# Altium PCB MiniPC.PcbDoc (part 17 of 24)
Units mm, origin at the board's own origin, x right, y up, seen from the top; angles counter-clockwise.
Board outline 175 x 155 mm, 16 copper layers (1_Top, 2_int1_(gnd), 3_int2_(power), 4_int3_(gnd), 5_int4_(sign), 6_int5_(power), 7_int6_(sign), 8_int7_(power), 9_int8_(gnd), 10_int9_(sign), 11_int10_(gnd), 12_int11_(sign), 13_int12_(gnd), 14_int13_(power), 15_int14_(gnd), 16_Bottom), stack 2.008 mm thick; 1046 components, 837 nets, 6010 pads, 4009 vias.
Unrouted connection lines stored in the file: 564.
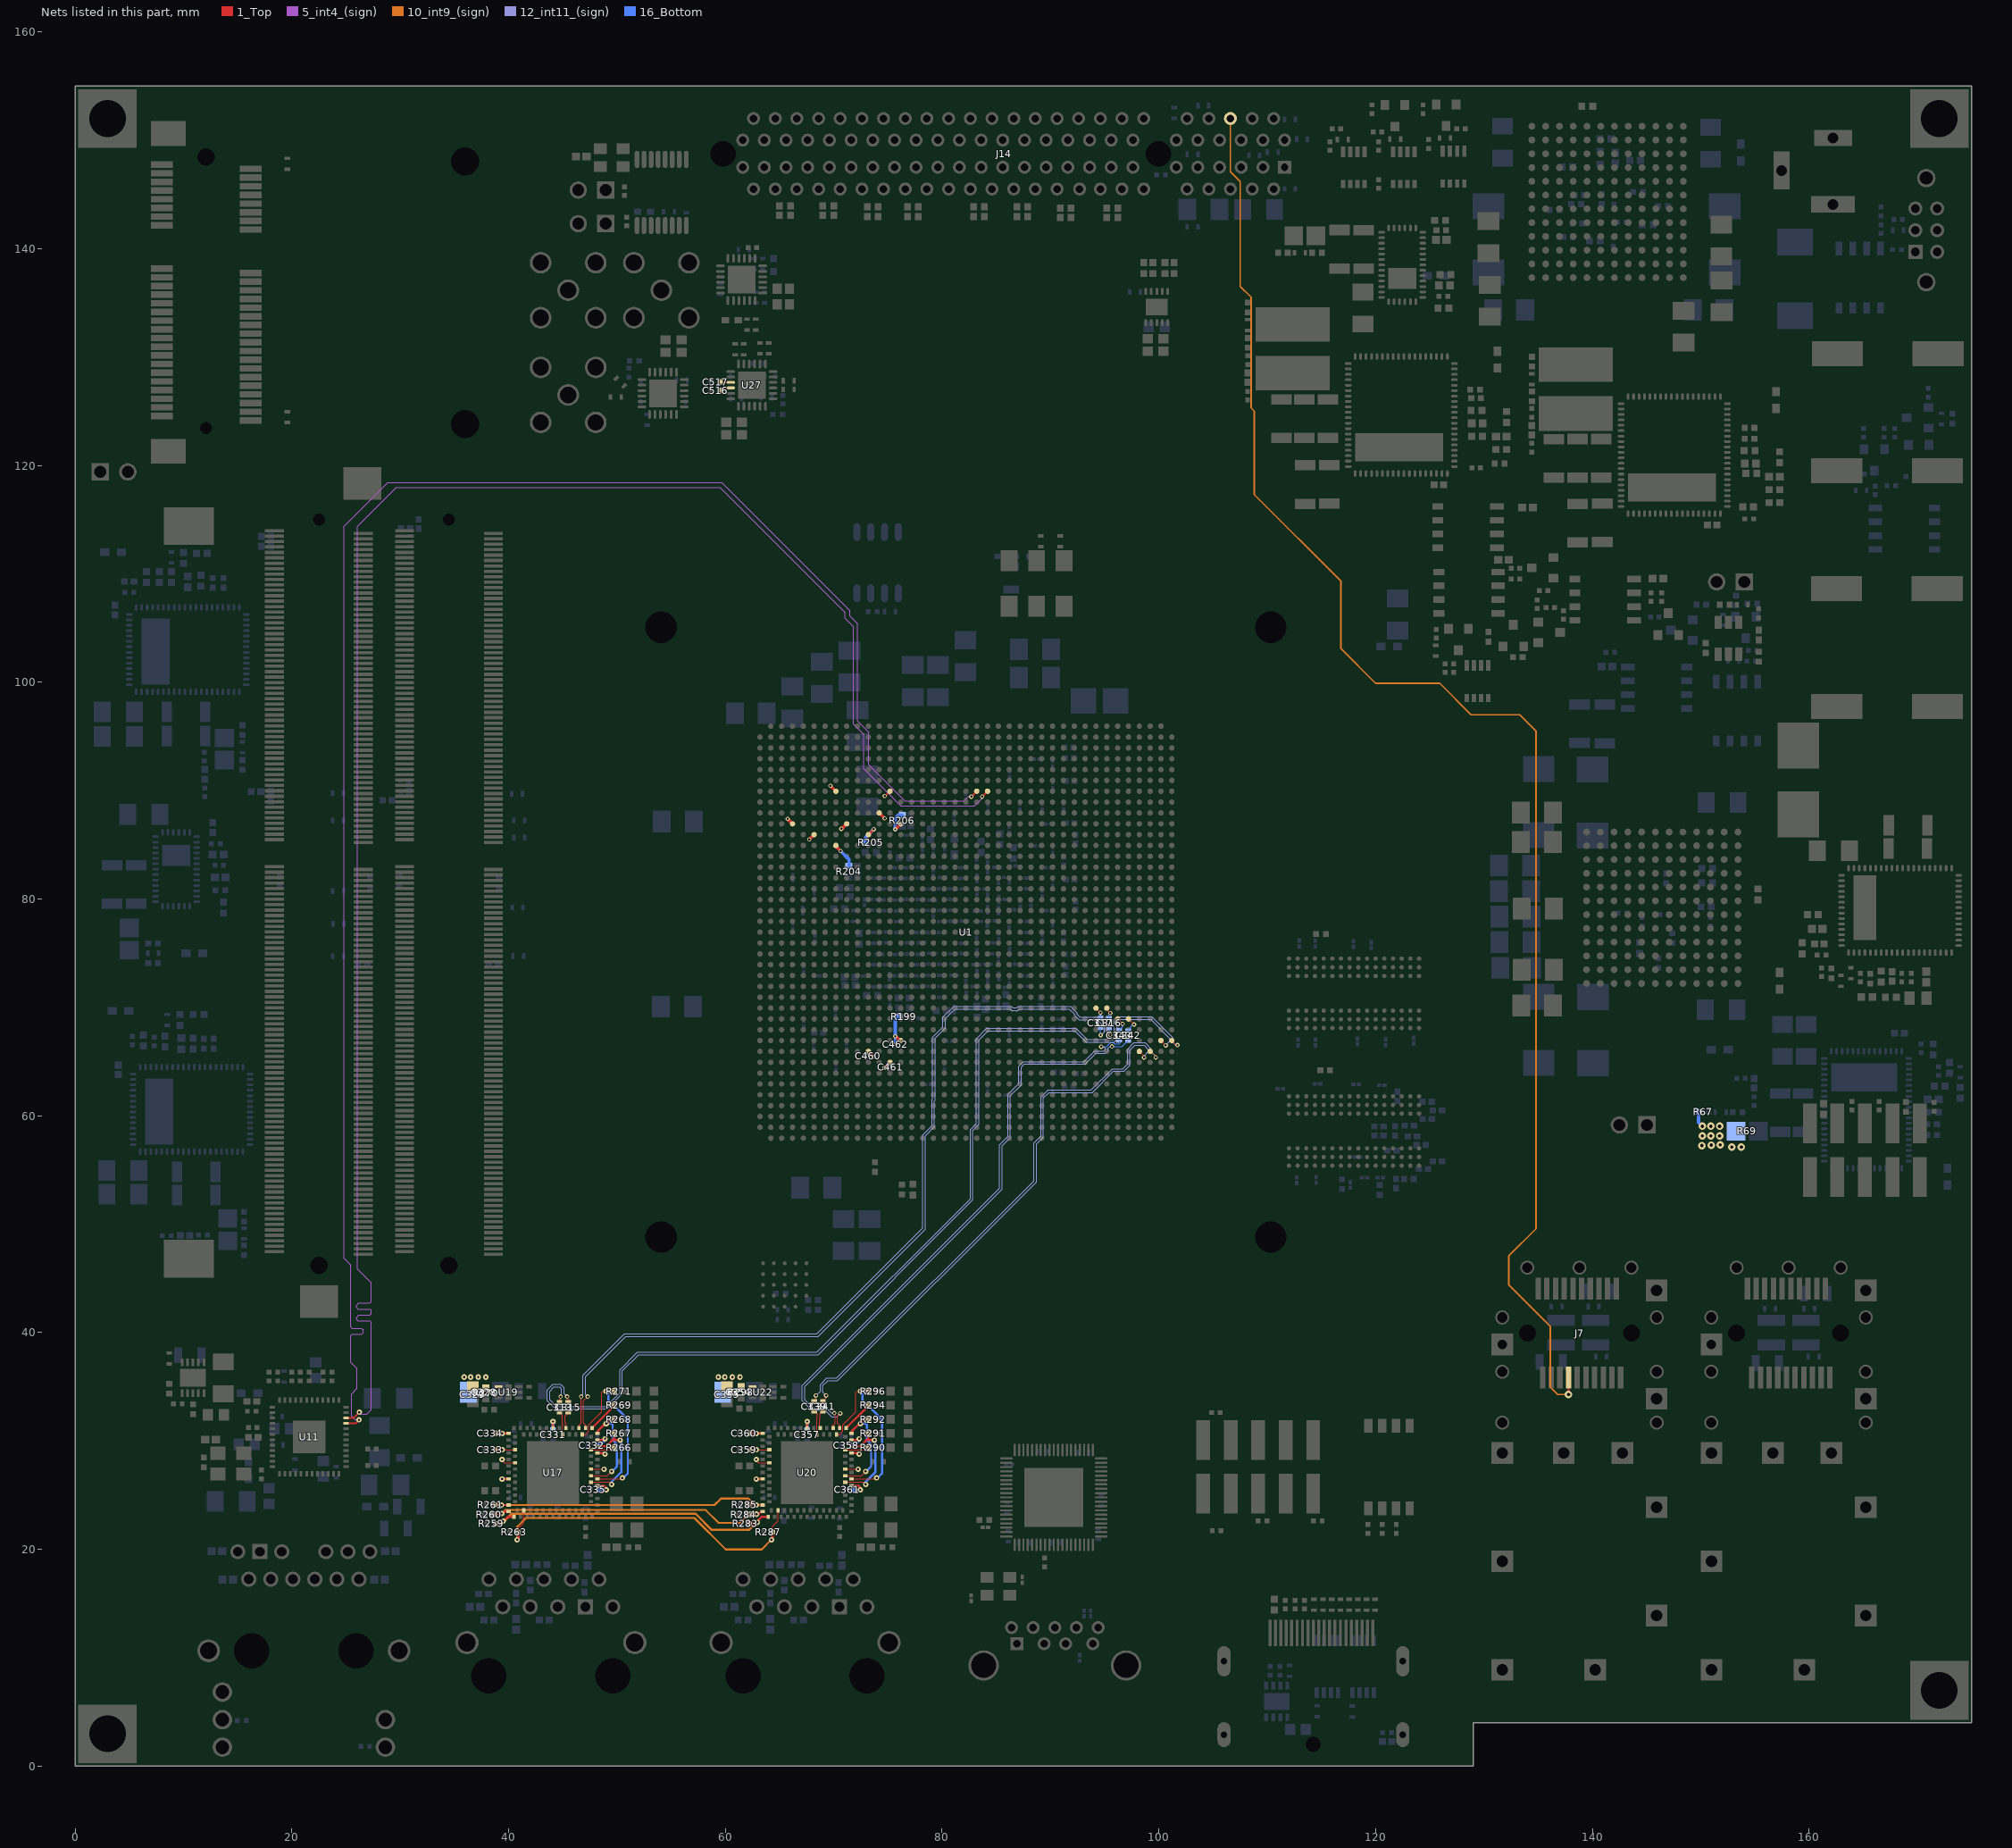
[diagram p29: the nets of this part, all layers, seen from the top]

## Via types
v1: diameter 0.4, hole 0.2, 1_Top to 16_Bottom, tented both sides, 1658 vias
v2: diameter 0.5, hole 0.2, 1_Top to 16_Bottom, tented both sides, 1014 vias
v3: diameter 0.7, hole 0.3, 1_Top to 16_Bottom, tented both sides, 915 vias
v4: diameter 0.6, hole 0.2, 1_Top to 16_Bottom, tented both sides, 278 vias
v5: diameter 0.4, hole 0.2, 1_Top to 16_Bottom, 93 vias
v6: diameter 0.4/0/0/0/0/0/0/0/0/0/0/0/0/0/0/0.4 (per signal layer), hole 0.2, 1_Top to 16_Bottom, tented both sides, 18 vias
v7: diameter 0.4/0/0/0/0/0/0/0/0/0/0/0.4/0.4/0.4/0.4/0.4 (per signal layer), hole 0.2, 1_Top to 16_Bottom, tented both sides, 16 vias
v8: diameter 0.5, hole 0.254, 1_Top to 16_Bottom, tented both sides, 15 vias
v9: diameter 0.5, hole 0.2, 1_Top to 16_Bottom, 2 vias

## Nets (pads, with @x,y where several pads share a name; then routed paths per layer and width w, separated by ;. In a path a pad name is that pad's centre, name@x,y a point inside that pad or via, vN(x,y) a via of type N, cw(c..) or ccw(c..) an arc to the next point about the centre after c; other vN are vias at no path point) (continued)
ENET_HPS_TXD2: U1.G21 U11.21 | length 166.9
  1_Top w0.17: U11.21@25.012,31.625 25.876,31.625 v2(26.2,31.95) ; v1(82.694,89.439) U1.G21@83.194,89.939
  5_int4_(sign) w0.1: v2(26.2,31.95) 25.85,31.95 25.5,32.3 25.5,34.35 26.025,34.875 26.025,36.675 25.425,37.275 25.425,39.713 25.563,39.85 26.441,39.85 26.578,39.988 26.578,40.263 26.441,40.4 25.563,40.4 25.425,40.538 25.425,46.225 24.8,46.85 24.8,48.475 24.825,48.5 24.825,114.4 28.85,118.425 59.676,118.425 71.49,106.611 71.49,106.082 72.179,105.393 72.179,96.423 73.22,95.381 73.22,92.396 76.576,89.039 82.014,89.039 82.414,89.439 v1(82.694,89.439) ; v1@82.694,89.4 v1@82.7,89.4
ENET_HPS_TXD3: U1.G22 U11.22 | length 169.4
  1_Top w0.17: U11.22@25.012,32.125 25.69,32.125 26.214,32.65 v2(26.225,32.65) ; v1(83.694,89.439) U1.G22@84.194,89.939
  5_int4_(sign) w0.1: v2(26.225,32.65) 26.4,32.475 26.925,32.475 27.34,32.89 27.34,40.938 27.203,41.075 26.093,41.075 25.955,41.213 25.955,41.388 26.192,41.625 27.203,41.625 27.34,41.763 27.34,42.038 27.203,42.175 26.093,42.175 25.955,42.313 25.955,42.488 26.192,42.725 27.203,42.725 27.34,42.863 27.34,44.584 26.065,45.859 26.065,114.391 29.634,117.96 59.491,117.96 71.03,106.421 71.03,105.891 71.825,105.096 71.825,96.126 72.76,95.191 72.76,92.015 76.196,88.579 82.979,88.579 83.694,89.294 v1(83.694,89.439)
ENET_REFCLK_C_N: C516.1 U27.22 | length 1
  1_Top w0.1: C516.1@59.6,127 59.75,127.15 U27.22@60.5,127.15
ENET_REFCLK_C_P: C517.1 U27.21 | length 0.9
  1_Top w0.1: C517.1@59.6,127.7 59.65,127.65 U27.21@60.5,127.65
ENETA_DVDD: C328.2 C329.2 C331.2 C332.2 C333.2 C334.2 C335.2 R270.2 U17.A1 U17.A8 U17.A31 U17.A36 U17.A38 U17.A46 U17.B3 U17.B5 U17.B29 U19.4 | length 12.1
  1_Top w0.1: v2(39.4,28.3) 39.3,28.3 39.6,28 U17.B5@40.6,28 ; v2(39.4,29.2) U17.B3@40.6,29.2 ; U17.B29@47.6,27.4 v2(48.8,27.4)
  1_Top w0.2: C333.2@38.8,29.2 v2(39.4,29.2) ; v2(39.4,26.5) 39.3,26.5 U17.A8@40,26.5 ; v2(39.4,30.7) 39.3,30.7 U17.A1@40,30.7 ; U17.A46@44.1,31.2 v2(44.1,31.8) ; U17.A31@48.2,25.9 48.8,25.9 49,25.7 v2(49,25.5) ; U17.A36@48.2,28.9 48.7,28.9 48.8,28.8 v2(48.9,28.8) ; U17.A38@48.2,30.1 48.8,30.1 v2(48.9,30.2)
  1_Top w0.25: C334.2@38.8,30.7 v2@39.3,30.7
  16_Bottom w0.25: C331.2@44.1,31.1 v2(44.1,31.8) ; C332.2@48.2,29.6 48.4,29.6 v2@48.9,30.1 ; C335.2@48.3,25.5 v2(49,25.5)
  other v2: 35.9,35.9 36.5,35.9 37.2,35.9 37.9,35.9
ENETA_INTN: R261.1 R285.1 U17.A12 U20.A12 | length 26.7
  1_Top w0.2: R261.1@38.725,24.1 v2(39.35,24.1) U17.A12@40,24.1 ; R285.1@62.175,24.1 v2(62.85,24.1) U20.A12@63.45,24.1
  10_int9_(sign) w0.2: v2(39.35,24.1) 59,24.1 59.6,24.7 62.125,24.7 62.85,23.975 v2(62.85,24.1)
ENETA_LED_LINK10: R271.2 U17.A32 U17.B35 | length 17.4
  1_Top w0.1: U17.B35@46.8,30.6 47.1,30.6 47.4,30.9 47.4,31.5 48.6,32.7 48.6,34.5 48.7,34.6 v2(49,34.6) R271.2@49.7,34.6 ; U17.A32@48.2,26.5 50.5,26.5 v2(50.5,26.6)
  16_Bottom w0.2: v2@49.2,34.6 49.2,33.8 50.5,32.5 51,32 51,27 50.6,26.6 v2(50.5,26.6)
ENETA_LED_LINK100: R269.2 U17.A40 | length 2.9
  1_Top w0.2: U17.A40@47.7,31.2 49.7,33.2 R269.2@49.7,33.3
ENETA_LED_LINK1000: R268.2 U17.A39 U17.B28 | length 9.9
  1_Top w0.1: U17.B28@47.6,26.8 49.1,26.8 49.4,27.1 49.5,27.1 49.4,27.2 v2(49.5,27.2)
  1_Top w0.2: U17.A39@48.2,30.7 48.3,30.7 48.2,30.8 48.2,30.9 v2@48.95,31.65 ; v2(49,31.6) 49,31.8 49.6,31.8 R268.2@49.7,31.9
  16_Bottom w0.2: v2(49,31.6) 49.5,31.6 49.6,31.5 49.6,30.1 50,29.7 50,27.664 49.536,27.2 v2(49.5,27.2)
ENETA_LED_RX: R267.2 U17.A37 U17.B27 | length 9.7
  1_Top w0.1: U17.B27@47.6,26.2 49.3,26.2 v2(49.5,26)
  1_Top w0.2: U17.A37@48.2,29.5 49,29.5 49.258,29.758 49.6,30.1 ; R267.2@49.75,30.7 49.75,30.15 49.8,30.1 ; v2(50.3,30.075) 50.225,30 50.2,30 50.1,30.1 49.8,30.1 ; 49.6,30.1 49.8,30.1 ; 49.6,30.1 49.8,30.1
  16_Bottom w0.2: v2(49.5,26) 49.5,26.236 50.4,27.136 50.4,29.8 50.3,29.9 v2(50.3,30.075)
ENETA_LED_TX: R266.2 U17.B32 | length 1.9
  1_Top w0.1: U17.B32@47.6,29.2 49.4,29.2 R266.2@49.5,29.3
ENETA_MDC: R259.1 R283.1 U17.A14 U20.A14 | length 28.6
  1_Top w0.2: R259.1@38.8,22.4 39.3,22.4 v2(39.5,22.6) 39.9,23 U17.A14@40.5,23 ; R283.1@62.25,22.4 62.85,22.4 v2(62.95,22.5) 62.95,22.6 63.35,23 U20.A14@63.95,23
  10_int9_(sign) w0.2: v2(39.5,22.6) 39.6,22.6 40.3,23.3 57.241,23.3 58.741,21.8 62.15,21.8 62.85,22.5 v2(62.95,22.5)
ENETA_MDIO: R260.1 R284.1 U17.A13 U20.A13 | length 26.9
  1_Top w0.17: R260.1@38.9,23.225 39.275,23.225 v9(39.362,23.312) 39.55,23.5 U17.A13@40,23.5 ; R284.1@62.375,23.225 62.85,23.225 v9(62.875,23.25) ; v9@62.875,23.225 63.025,23.225 63.3,23.5 U20.A13@63.45,23.5
  10_int9_(sign) w0.17: v9(39.362,23.312) 39.685,23.635 58.19,23.635 59.375,22.45 61.35,22.45 62.15,23.25 v9(62.875,23.25)
ENETA_RESETN: R263.1 R287.1 U17.B13 U20.B13 | length 32.5
  1_Top w0.1: R263.1@40.9,21.6 40.9,21.948 41.4,22.448 U17.B13@41.4,23.6 ; R287.1@64.35,21.6 64.35,22.15 64.85,22.65 U20.B13@64.85,23.6
  1_Top w0.25: v2(40.8,20.9) 40.9,21 R263.1@40.9,21.6 ; v2(64.25,20.9) 64.35,21 R287.1@64.35,21.6
  10_int9_(sign) w0.2: v2(40.8,20.9) 40.8,22.1 41.6,22.9 57.146,22.9 60.046,20 63.35,20 v2(64.25,20.9)
ENETA_RX_N: C317.1 U1.AG32 | length 1
  1_Top w0.1: U1.AG32@94.194,69.939 94.605,69.529 v5(94.605,69.503)
  16_Bottom w0.1: v5(94.605,69.503) 94.605,69.322 94.633,69.293 94.625,69.285 C317.1@94.625,69.075
ENETA_RX_P: C316.1 U1.AG33 | length 1.1
  1_Top w0.1: U1.AG33@95.194,69.939 95.194,69.806 v5(95.525,69.475)
  16_Bottom w0.1: C316.1@95.4,69.05 95.4,69.35 v5(95.525,69.475)
ENETA_RXC_N: C317.2 U17.A41 | length 79.8
  1_Top w0.1: U17.A41@47.1,31.2 47.1,31.45 46.91,31.64 46.91,33.71 v1(47.3,34.1)
  12_int11_(sign) w0.09: v1(47.3,34.1) 47.1,34.3 47.1,35.961 50.799,39.66 68.56,39.66 78.44,49.54 78.44,58.141 79.3,59.001 79.3,61.4 79.355,61.455 79.355,67.155 80.312,68.112 80.312,68.988 81.185,69.86 86.283,69.86 86.458,69.685 86.497,69.685 86.527,69.715 86.813,69.715 86.843,69.685 86.942,69.685 87.117,69.86 91.74,69.86 92.215,69.385 92.215,69.258 92.613,68.86 94.315,68.86 94.975,68.2 94.975,67.75 94.675,67.45 v5(94.625,67.45)
  16_Bottom w0.1: v5(94.625,67.45) C317.2@94.625,68.075
ENETA_RXC_P: C316.2 U17.A42 | length 80.3
  1_Top w0.1: U17.A42@46.5,31.2 46.5,31.45 46.69,31.64 46.69,33.801 46.7,33.811 v1(46.7,34.1)
  12_int11_(sign) w0.09: v1(46.7,34.1) 46.86,34.26 46.86,36.06 50.7,39.9 68.461,39.9 78.2,49.639 78.2,58.24 79.06,59.1 79.06,61.53 79.115,61.585 79.115,67.254 80.072,68.212 80.072,69.087 81.086,70.1 86.382,70.1 86.527,69.955 86.873,69.955 87.018,70.1 91.839,70.1 91.864,70.076 92.455,69.484 92.455,69.357 92.712,69.1 94.414,69.1 95.215,68.299 95.215,67.743 v5(95.505,67.453)
  16_Bottom w0.1: C316.2@95.4,68.05 95.505,67.945 v5(95.505,67.453) v5@95.505,67.445
ENETA_TX_N: C315.1 U1.AK38 | length 90.6
  1_Top w0.1: v1(45.4,34.1) 45.4,33.91 45.5,33.81 C315.1@45.5,33.6 ; U1.AK38@100.194,66.939 v1(100.633,66.5)
  12_int11_(sign) w0.09: v1(45.4,34.1) 45.14,34.36 45.14,34.899 44.799,35.24 44.101,35.24 43.56,34.699 43.56,33.701 44.301,32.96 49.099,32.96 50.5,34.361 50.5,36.46 52,37.96 68.56,37.96 82.84,52.24 82.84,58.641 83.4,59.201 83.4,67 84.215,67.815 85.457,67.815 85.942,67.815 92.26,67.815 93.29,66.785 95.899,66.785 96.14,67.026 96.14,68.74 96.3,68.9 99.247,68.9 101.047,67.1 101.047,66.913 v1(100.633,66.5)
ENETA_TX_P: C313.1 U1.AK39 | length 90
  1_Top w0.1: C313.1@44.7,33.6 44.7,33.81 44.8,33.91 v1(44.8,34.1) ; U1.AK39@101.194,66.939 101.7,66.433 101.71,66.443 v1(101.71,66.52)
  12_int11_(sign) w0.09: v1(44.8,34.1) 44.9,34.2 44.9,34.8 44.7,35 44.2,35 43.8,34.6 43.8,33.8 44.4,33.2 49,33.2 50.26,34.46 50.26,36.559 51.901,38.2 68.461,38.2 82.6,52.339 82.6,58.74 83.16,59.3 83.16,67.099 84.116,68.055 85.557,68.055 85.843,68.055 92.359,68.055 93.389,67.025 95.8,67.025 95.9,67.125 95.9,68.839 96.201,69.14 99.346,69.14 101.287,67.199 101.287,66.813 101.58,66.52 v1(101.71,66.52)
ENETA_TXC_N: C315.2 U17.A44 | length 1.6
  1_Top w0.1: U17.A44@45.3,31.2 45.3,31.6 45.2,31.7 45.2,32.3 C315.2@45.5,32.6
ENETA_TXC_P: C313.2 U17.B38 | length 2.1
  1_Top w0.1: C313.2@44.7,32.6 44.98,32.32 44.98,31.52 45,31.5 U17.B38@45,30.6
ENETB_DVDD: C354.2 C355.2 C357.2 C358.2 C359.2 C360.2 C361.2 R293.2 U20.A1 U20.A8 U20.A31 U20.A36 U20.A38 U20.A46 U20.B3 U20.B5 U20.B29 U22.4 | length 12.1
  1_Top w0.1: v2(62.85,28.3) 62.75,28.3 63.05,28 U20.B5@64.05,28 ; v2(62.85,29.2) U20.B3@64.05,29.2 ; U20.B29@71.05,27.4 v2(72.25,27.4)
  1_Top w0.2: C359.2@62.25,29.2 v2(62.85,29.2) ; v2(62.85,26.5) 62.75,26.5 U20.A8@63.45,26.5 ; v2(62.85,30.7) 62.75,30.7 U20.A1@63.45,30.7 ; U20.A46@67.55,31.2 v2(67.55,31.8) ; U20.A31@71.65,25.9 72.25,25.9 72.45,25.7 v2(72.45,25.5) ; U20.A36@71.65,28.9 72.15,28.9 72.25,28.8 v2(72.35,28.8) ; U20.A38@71.65,30.1 72.25,30.1 v2(72.35,30.2)
  1_Top w0.25: C360.2@62.25,30.7 v2@62.75,30.7
  16_Bottom w0.25: C357.2@67.55,31.1 v2(67.55,31.8) ; C358.2@71.65,29.6 71.85,29.6 v2@72.35,30.1 ; C361.2@71.75,25.5 v2(72.45,25.5)
  other v2: 59.35,35.9 59.95,35.9 60.65,35.9 61.35,35.9
ENETB_LED_LINK10: R296.2 U20.A32 U20.B35 | length 17.4
  1_Top w0.1: U20.B35@70.25,30.6 70.55,30.6 70.85,30.9 70.85,31.5 72.05,32.7 72.05,34.5 72.15,34.6 v2(72.45,34.6) R296.2@73.15,34.6 ; U20.A32@71.65,26.5 73.95,26.5 v2(73.95,26.6)
  16_Bottom w0.2: v2@72.65,34.6 72.65,33.8 73.95,32.5 74.45,32 74.45,27 74.05,26.6 v2(73.95,26.6)
ENETB_LED_LINK100: R294.2 U20.A40 | length 2.9
  1_Top w0.2: U20.A40@71.15,31.2 73.15,33.2 R294.2@73.15,33.3
ENETB_LED_LINK1000: R292.2 U20.A39 U20.B28 | length 9.9
  1_Top w0.1: U20.B28@71.05,26.8 72.55,26.8 72.85,27.1 72.95,27.1 72.85,27.2 v2(72.95,27.2)
  1_Top w0.2: U20.A39@71.65,30.7 71.75,30.7 71.65,30.8 71.65,30.9 v2@72.4,31.65 ; v2(72.45,31.6) 72.45,31.8 73.05,31.8 R292.2@73.15,31.9
  16_Bottom w0.2: v2(72.45,31.6) 72.95,31.6 73.05,31.5 73.05,30.1 73.45,29.7 73.45,27.664 72.986,27.2 v2(72.95,27.2)
ENETB_LED_RX: R291.2 U20.A37 U20.B27 | length 9.7
  1_Top w0.1: U20.B27@71.05,26.2 72.75,26.2 v2(72.95,26)
  1_Top w0.2: U20.A37@71.65,29.5 72.45,29.5 72.708,29.758 73.05,30.1 ; R291.2@73.2,30.7 73.2,30.15 73.25,30.1 ; v2(73.75,30.075) 73.675,30 73.65,30 73.55,30.1 73.25,30.1 ; 73.05,30.1 73.25,30.1 ; 73.05,30.1 73.25,30.1
  16_Bottom w0.2: v2(72.95,26) 72.95,26.236 73.85,27.136 73.85,29.8 73.75,29.9 v2(73.75,30.075)
ENETB_LED_TX: R290.2 U20.B32 | length 1.9
  1_Top w0.1: U20.B32@71.05,29.2 72.85,29.2 R290.2@72.95,29.3
ENETB_RX_N: C343.1 U1.AH34 | length 1.3
  1_Top w0.1: U1.AH34@96.194,68.939 v5(96.65,68.483)
  16_Bottom w0.1: C343.1@96.325,67.925 96.65,68.25 v5(96.65,68.483)
ENETB_RX_P: C342.1 U1.AH35 | length 1.5
  1_Top w0.1: U1.AH35@97.194,68.939 v5(97.708,68.425)
  16_Bottom w0.1: C342.1@97.15,67.9 97.675,68.425 v5(97.708,68.425)
ENETB_RXC_N: C343.2 U20.A41 | length 56.4
  1_Top w0.1: U20.A41@70.55,31.2 70.55,31.45 70.36,31.64 70.36,32.31 v1(70.6,32.55)
  12_int11_(sign) w0.09: v1(70.6,32.55) 70.29,32.24 69.796,32.24 69.176,32.86 67.941,32.86 67.1,33.701 67.1,35.132 85.3,53.332 85.3,57.34 86.06,58.1 86.06,61.96 87.06,62.96 87.06,64.587 87.473,65 93.1,65 94.09,65.99 94.946,65.99 95.075,66.119 95.075,66.225 94.955,66.345 94.79,66.345 94.76,66.375 v5(94.675,66.375)
  16_Bottom w0.1: v5(94.675,66.375) 95.169,66.375 95.534,66.74 95.816,66.74 95.936,66.62 96.35,66.62 96.469,66.739 96.469,66.781 C343.2@96.325,66.925
ENETB_RXC_P: C342.2 U20.A42 | length 54.6
  1_Top w0.1: U20.A42@69.95,31.2 69.95,31.45 70.14,31.64 70.14,32.485 v1(70.05,32.575)
  12_int11_(sign) w0.09: v1(70.05,32.575) 69.8,32.575 69.275,33.1 68.04,33.1 67.34,33.8 67.34,35.032 85.54,53.232 85.54,57.241 86.3,58.001 86.3,61.861 87.3,62.861 87.3,64.488 87.572,64.76 93.199,64.76 94.189,65.75 95.045,65.75 95.315,66.02 95.315,66.225 95.49,66.4 v5(95.675,66.4)
  16_Bottom w0.1: v5(95.675,66.4) 96.575,66.4 97.025,66.85 97.1,66.85 C342.2@97.15,66.9
ENETB_TX_N: C341.1 U1.AL36 | length 51.5
  1_Top w0.1: C341.1@69,33.7 69.3,34 v1(69.3,34.2) v1@69.25,34.25 ; U1.AL36@98.194,65.939 98.63,65.503 v1(98.63,65.38)
  12_int11_(sign) w0.09: v1(69.3,34.2) 69,34.5 69,35.1 69.46,35.56 70.359,35.56 88.7,53.901 88.7,57.388 89.349,58.037 89.349,61.637 89.872,62.16 93.859,62.16 95.8,64.101 96.776,64.101 97.34,64.665 97.34,66.055 97.785,66.5 98.63,66.5 99.03,66.1 99.03,65.93 98.63,65.53 v1(98.63,65.38)
ENETB_TX_P: C339.1 U1.AL37 | length 52.3
  1_Top w0.1: C339.1@68.35,33.7 v1(68.35,34.2) v1@68.35,34.25 ; U1.AL37@99.194,65.939 99.261,65.939 99.71,65.49 v1(99.71,65.39)
  12_int11_(sign) w0.09: v1(68.35,34.2) 68.36,34.2 68.76,34.6 68.76,35.199 69.361,35.8 70.26,35.8 88.46,54 88.46,57.487 89.109,58.136 89.109,61.736 89.773,62.4 93.76,62.4 95.701,64.341 96.676,64.341 97.1,64.764 97.1,66.154 97.686,66.74 98.729,66.74 99.27,66.199 99.27,65.93 99.71,65.49 v1(99.71,65.39)
ENETB_TXC_N: C341.2 U20.A44 | length 1.7
  1_Top w0.1: U20.A44@68.75,31.2 68.7,31.25 68.7,31.989 68.72,32.009 68.72,32.52 68.9,32.7 C341.2@69,32.7
ENETB_TXC_P: C339.2 U20.B38 | length 2.3
  1_Top w0.1: C339.2@68.2,32.7 68.3,32.7 68.5,32.5 68.5,32.1 68.45,32.05 U20.B38@68.45,30.6
EXTA_SDA: J7.4 J14.B6 | length 140.9
  1_Top w0.17: v3(137.8,34.3) J7.4@137.8,35.85
  10_int9_(sign) w0.15: J14.B6@106.6,152 106.6,147.1 107.5,146.2 107.5,136.51 108.51,135.5 108.51,125.29 108.8,125 108.8,117.3 116.8,109.3 116.8,103.1 120,99.9 125.9,99.9 128.8,97 133.275,97 134.8,95.475 134.8,49.6 132.275,47.075 132.275,44.425 136.1,40.6 136.1,35 136.8,34.3 v3(137.8,34.3)
FMCBVADJ: C460.2 C461.2 C462.2 R67.2 R69.1 R199.1 R204.1 R205.1 R206.1 U1.AK14 U1.AL11 U1.AM13 U1.G8 U1.G13 U1.J12 U1.K4 U1.K9 U1.K14 U1.L6 U1.L11 U1.M8 | length 18.6
  1_Top w0.17: v1(74.7,89.5) 74.755,89.5 U1.G13@75.194,89.939
  1_Top w0.25: v1(69.694,90.439) U1.G8@70.194,89.939 ; U1.AL11@73.194,65.939 v1(73.683,65.45) ; U1.L11@73.194,85.939 v1(73.694,86.439)
  1_Top w0.3: v1(65.75,87.4) 65.75,87.383 U1.K4@66.194,86.939 ; v1(67.745,85.495) 67.75,85.495 U1.L6@68.194,85.939 ; U1.M8@70.194,84.939 70.194,84.856 v1(70.625,84.425) ; v1(70.7,86.475) 70.73,86.475 U1.K9@71.194,86.939 ; U1.J12@74.194,87.939 v1(74.7,87.433) ; v1(74.7,64.425) 74.7,64.445 U1.AM13@75.194,64.939 ; v1(75.675,86.425) 75.68,86.425 U1.K14@76.194,86.939 ; v1@75.679,67.379 v1(75.679,67.328) 75.722,67.328 76.111,66.939 U1.AK14@76.194,66.939
  16_Bottom w0.3: v1(70.625,84.425) 71.35,83.7 71.4,83.7 R204.1@71.4,83.025 ; R205.1@72.925,85.225 72.925,85.67 v1(73.694,86.439) ; C460.2@73.175,65.785 73.354,65.785 73.683,65.456 v1(73.683,65.45) ; v1(74.7,64.425) 75.035,64.76 C461.2@75.225,64.76 ; v1(75.675,86.425) 75.675,87.475 75.925,87.725 R206.1@76.325,87.725 ; C462.2@75.7,66.86 75.7,67.307 v1(75.679,67.328) 75.679,68.829 R199.1@76,69.15 ; R67.2@149.79,60.36 149.79,59.375 v3(150.13,59.035)
  other v3: 152.87,57.11 153.74,57.11 150.11,57.26 150.97,57.3 151.78,57.31 150.13,58.135 150.93,58.135 151.73,58.135 150.93,59.035 151.73,59.035